# Altium PCB NB2DSK01.PcbDoc (part 3 of 17)
Units mil, origin at the board's own origin, x right, y up, seen from the top; angles counter-clockwise.
Board outline 11815 x 6500.03 mil, 8 copper layers (Top Layer, MidLayer1, MidLayer2, GND, PWR, MidLayer3, MidLayer4, Bottom Layer), stack 74.62 mil thick; 798 components, 1002 nets, 3927 pads, 3182 vias.
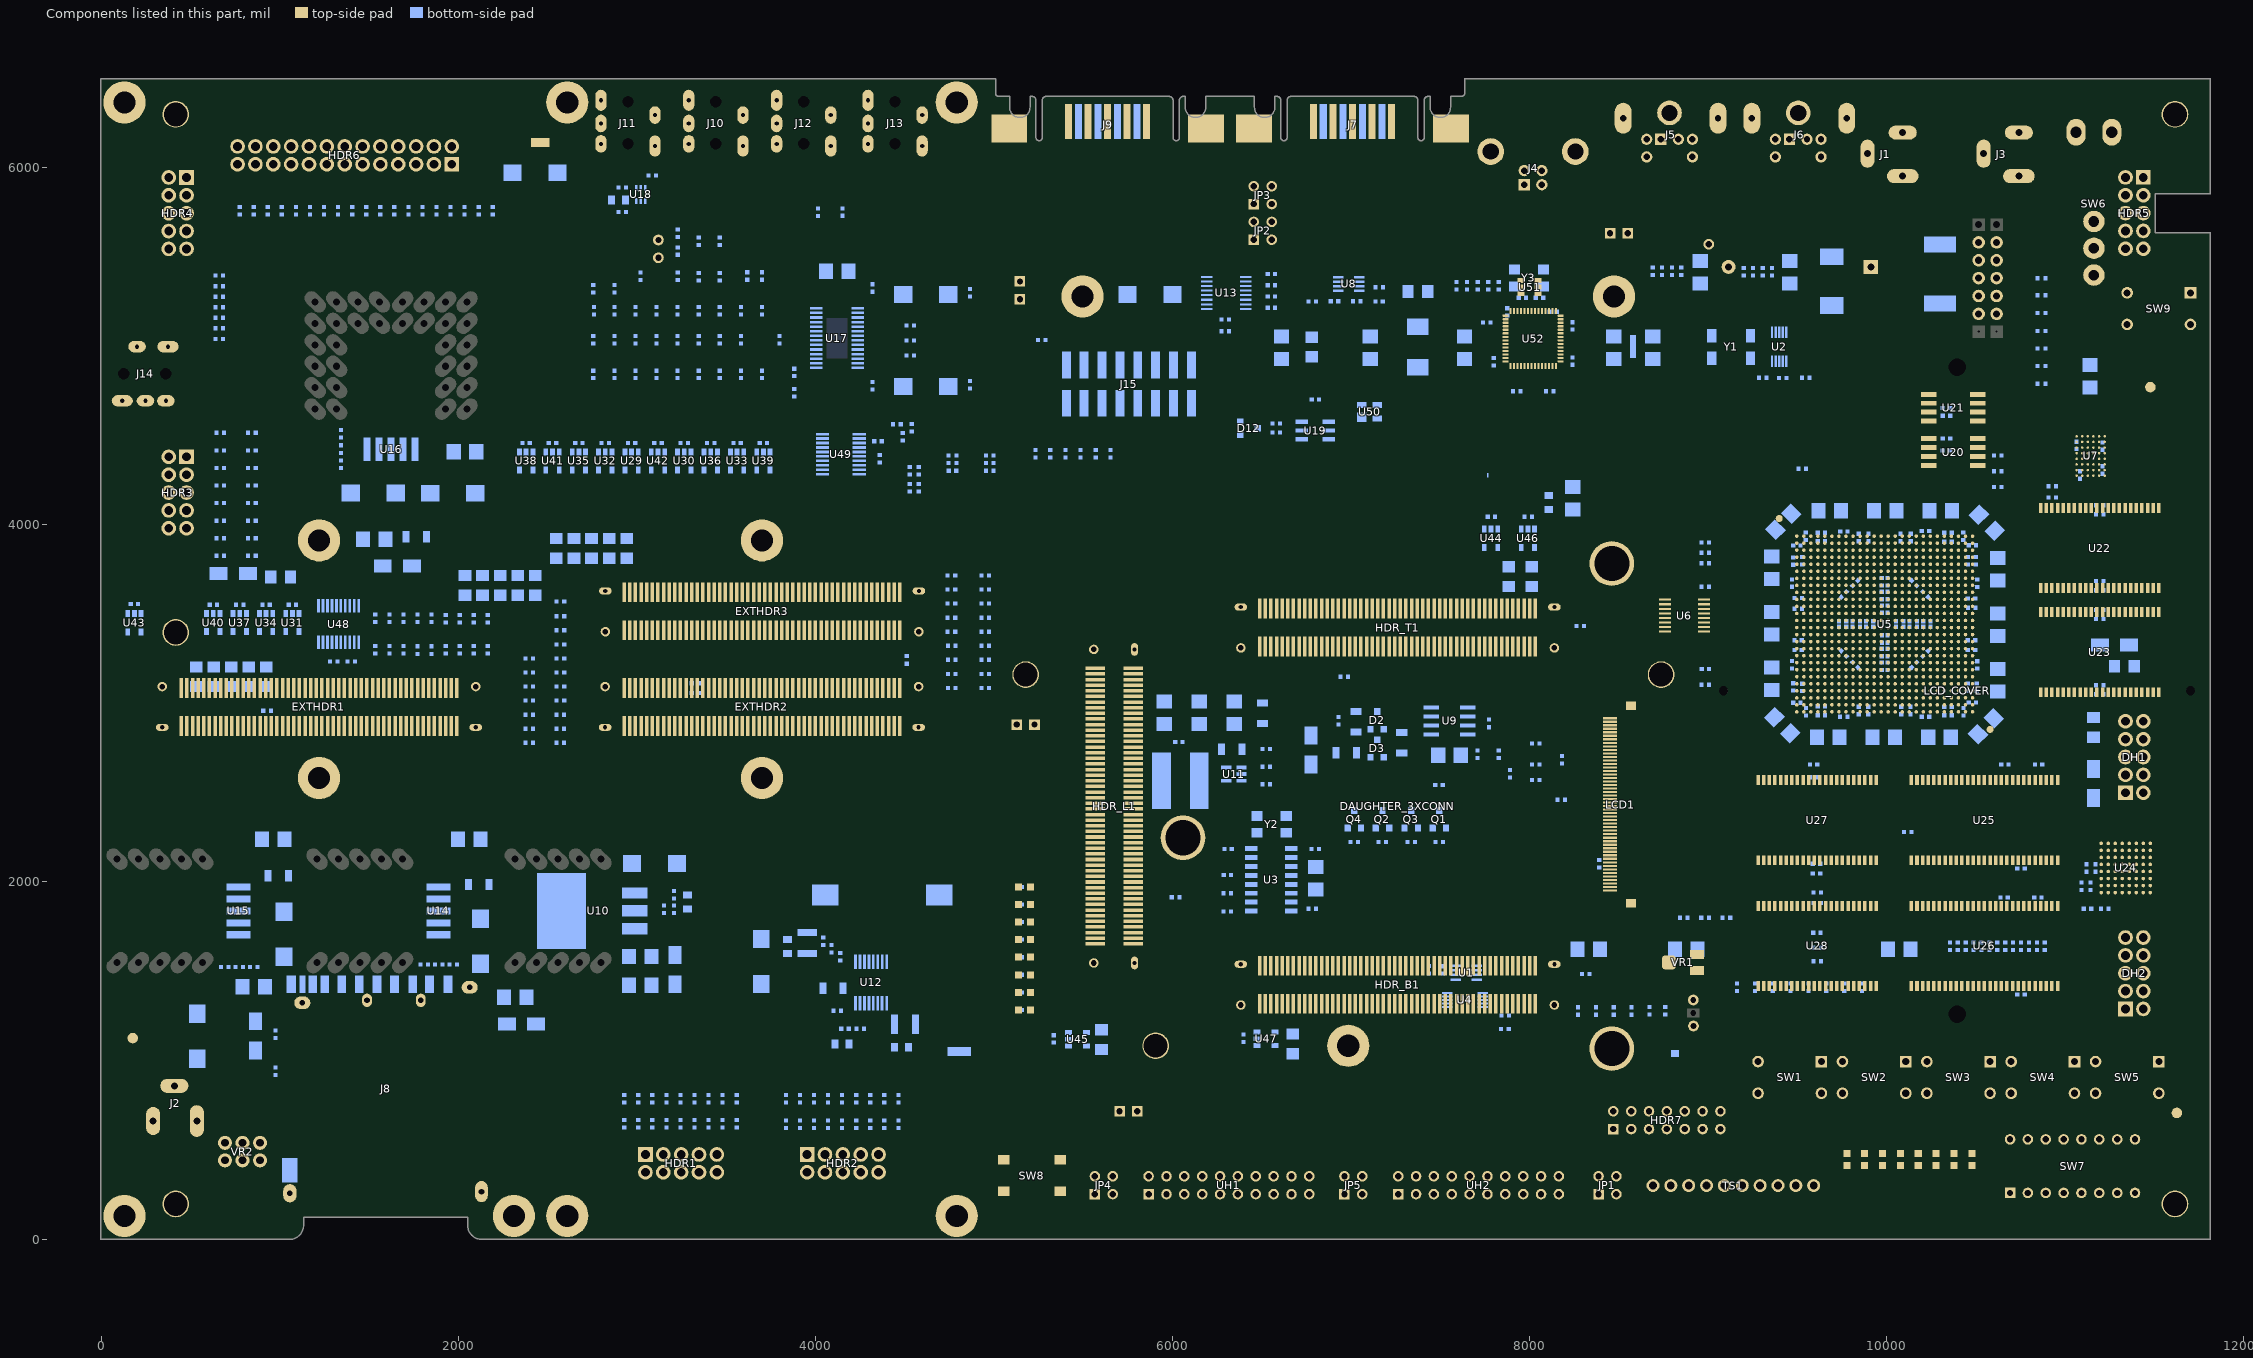
[diagram p9: the components of this part, seen from the top]

## Components (designator, comment, footprint, x,y, rotation, side; value= is the part's Value field where it differs from the comment) (continued)
R303 "1K 1%" RESC1005-STAR 10866.58,5086 r0 bottom locked (schematic designator R12)
R304 "4K7 1%" RESC1005-STAR 10866.58,4987.57 r0 bottom locked (schematic designator R8)
R305 "100R 1%" RESC1005-STAR 10866.58,5381.27 r180 bottom locked (schematic designator R9)
R306 "100R 1%" RESC1005-STAR 10866.58,5286 r180 bottom locked (schematic designator R10)
R307 "100R 1%" RESC1005-STAR 10866.58,4889.15 r0 bottom locked (schematic designator R11)
R308 "100R 1%" RESC1005-STAR 10866.58,4790.72 r0 bottom locked (schematic designator R13)
R309 "1K 1%" RESC1005-STAR 10866.58,5186 r180 bottom locked (schematic designator R14)
R311 "2K7 1%" RESC1005-STAR 7649.66,5338.57 r90 bottom (schematic designator R1_US)
R312 "5K6 1%" RESC1005-STAR 7590.54,5338.57 r270 bottom (schematic designator R2_US)
R313 "10K 1%" RESC1005-STAR 7827.02,5338.57 r270 bottom (schematic designator R8_US)
R314 "4K7 1%" RESC1005-STAR 8112.2,4748.03 r0 bottom locked (schematic designator R4_US)
R315 "27R 1%" RESC1005-STAR 9527.54,4314.95 r180 bottom locked (schematic designator R3_US)
R316 "4K7 1%" RESC1005-STAR 7927.17,4748.03 r180 bottom locked (schematic designator R7_US)
R317 "10M 1%" RESC3216 7373.87,5307.09 r180 bottom (schematic designator R9_US)
R318 "4K7 1%" RESC1005-STAR 7767.9,5338.57 r270 bottom (schematic designator R5_US)
R319 "4K7 1%" RESC1005-STAR 7708.78,5338.57 r270 bottom (schematic designator R6_US)
R320 "120R 1%" RESC1005-STAR 5231.88,4398.03 r270 bottom (schematic designator R3)
SW1 "DPNO TACTILE" IT-2175#1 9456.69,905.51 r180 top locked
SW2 "DPNO TACTILE" IT-2175#1 9929.13,905.51 r180 top locked
SW3 "DPNO TACTILE" IT-2175#1 10401.57,905.51 r180 top locked
SW4 "DPNO TACTILE" IT-2175#1 10874.02,905.51 r180 top locked
SW5 "DPNO TACTILE" IT-2175#1 11346.46,905.51 r180 top locked
SW6 "SPDT SUB" T8019L-TNQ 11160.24,6492.13 r180 top locked (schematic designator SW8)
SW7 "DIP-16 8-way Switch" DIP-16-KEY 10690.32,258.43 r0 top locked (schematic designator SW1)
SW8 "SPNO" SW_DTSM-61NT/R 5212.6,356.3 r0 top locked (schematic designator SW1)
SW9 "DPNO TACTILE" IT-2175#2 11523.62,5211.09 r180 top (schematic designator SW1)
TP1 "5V0" TestPin#1 10614.94,5381.97 r0 top (schematic designator TP2)
TP2 "32K768HZ" TestPin#2 9003.27,5571.82 r180 top locked (schematic designator TP1)
TP3 "REF CLK" TestPin#3 8917.31,1193.48 r180 top (schematic designator TP1)
TP4 "FPGA CLK" TestPin#3 8916.9,1339.03 r180 top (schematic designator TP2)
TP5 "-7V5" TestPin#1 10514.94,5581.97 r180 top (schematic designator TP1)
TP6 "9V0" TestPin#1 10514.94,5381.97 r180 top (schematic designator TP1)
TP7 "VCCX" TestPin#1 10614.94,5581.97 r0 top (schematic designator TP1)
TP8 "16V5" TestPin#1 10514.94,5481.97 r180 top (schematic designator TP1)
TP9 "1V2" TestPin#1 10614.94,5481.97 r0 top (schematic designator TP1)
TP10 "1V8" TestPin#1 10614.94,5281.97 r0 top (schematic designator TP1)
TP11 "2V5" TestPin#1 10514.94,5281.97 r180 top (schematic designator TP1)
TP12 "3V3" TestPin#1 10514.94,5181.97 r180 top (schematic designator TP1)
TP13 "MIXER LEFT" TestPin#2 3120.73,5495.67 r180 top locked (schematic designator TP1)
TP14 "MIXER RIGHT" TestPin#2 3120.73,5595.67 r180 top locked (schematic designator TP2)
TP15 "VBATT" TestPin#1 10614.94,5181.97 r0 top
TS1 "TERMINAL 10 HEADER" TS2.54X10 8690.67,300 r90 top locked
U1 "MAX1037EKA-T" SOT65P280-8 7645.59,1492.06 r180 bottom
U2 "DS1391U-33" SSOP50P490-10 9397.66,4997.47 r0 bottom locked (schematic designator U5)
U3 "ICS307-02" SOIC127P600-16 6553.15,2012.01 r270 bottom locked (schematic designator U1)
U4 "MAX5841MEUB" TSSOP50P490-10 7637.8,1339.38 r0 bottom (schematic designator U1)
U5 "XC3S1500-4FG676C" BGA100P26X26-676 9988.19,3444.88 r0 top locked (schematic designator U1)
U6 "AD7843ARU" TSOP65P638-16 8867.13,3491.5 r270 top locked (schematic designator U15)
U7 "XCF08PFS48C" BGA80P8X6-48 11141.73,4385.83 r270 top locked (schematic designator U1)
U8 "MAX3051EKA-T" SOT65P280-8 6986.05,5349.48 r180 bottom locked (schematic designator U1)
U9 "VRG-100mA-1.2V-37V-4%-75102" SOP127P600-8 7551.18,2901.77 r270 bottom locked (schematic designator U1)
U10 "LM1084IS-ADJ" TO254P1435-4 2988.68,1938.45 r270 bottom (schematic designator U1)
U11 "LM2704MF-ADJCT-ND" SOT95P284-5 6343.5,2604.33 r270 bottom locked (schematic designator U1)
U12 "MAX1831EEE" SOP63P602-16 4311.68,1437.45 r90 bottom (schematic designator U1)
U13 "MAX3232EUE" TSOP65P638-16 6301.84,5299.21 r270 bottom locked (schematic designator U9)
U14 "TPS75501KTTT" TO-263 1888.68,1838.45 r270 bottom (schematic designator U1)
U15 "TPS75501KTTT" TO-263 768.68,1838.45 r270 bottom (schematic designator U1)
U16 "TPS75501KTTT" TO-263 1623.68,4423.45 r180 bottom (schematic designator U1)
U17 "LM4849MH" TSOP65P640_HS-28 4003.94,4879.92 r90 bottom (schematic designator U1)
U18 "MAX9812L" SC70_6L 3047.24,5814.96 r180 bottom (schematic designator U1MIC)
U19 "DS2406" TSOC6 6799.27,4528.53 r270 bottom (schematic designator U1_NB)
U20 "M25P80-VMW6 8Mbit Serial Flash" SOIC8-200-BODY 10234.25,4483.07 r270 top locked (schematic designator U1)
U21 "M25P80-VMW6 8Mbit Serial Flash" SOIC8-200-BODY 10234.25,4731.1 r270 top locked (schematic designator U2)
U22 "SRAM-256Kx16" TSOP80P1176-44 11192.91,3870.08 r0 top locked (schematic designator U1)
U23 "SRAM-256Kx16" TSOP80P1176-44 11192.91,3287.4 r0 top locked (schematic designator U2)
U24 "S29GL256N11FFIV10" BGA100P8X8-64 11338.58,2078.56 r270 top locked (schematic designator U1)
U25 "SDRAM-16Mx16" TSOP80P1176-54 10547.25,2346.46 r180 top locked (schematic designator U1)
U26 "SDRAM-16Mx16" TSOP80P1176-54 10547.25,1641.73 r180 top locked (schematic designator U2)
U27 "SRAM-256Kx16" TSOP80P1176-44 9610.24,2346.46 r180 top locked (schematic designator U1)
U28 "SRAM-256Kx16" TSOP80P1176-44 9610.24,1641.73 r180 top locked (schematic designator U2)
U29 "MAX4372" SOT-23-5 2933.07,4409.45 r0 bottom (schematic designator U8)
U30 "MAX4372" SOT-23-5 3228.35,4409.45 r0 bottom (schematic designator U15)
U31 "MAX4372" SOT-23-5 1033.46,3503.94 r0 bottom (schematic designator U1)
U32 "MAX4372" SOT-23-5 2785.43,4409.45 r0 bottom (schematic designator U9)
U33 "MAX4372" SOT-23-5 3523.62,4409.45 r0 bottom (schematic designator U16)
U34 "MAX4372" SOT-23-5 885.83,3503.94 r0 bottom (schematic designator U2)
U35 "MAX4372" SOT-23-5 2637.8,4409.45 r0 bottom (schematic designator U10)
U36 "MAX4372" SOT-23-5 3375.98,4409.45 r0 bottom (schematic designator U17)
U37 "MAX4372" SOT-23-5 738.19,3503.94 r0 bottom (schematic designator U3)
U38 "MAX4372" SOT-23-5 2342.52,4409.45 r0 bottom (schematic designator U11)
U39 "MAX4372" SOT-23-5 3671.26,4409.45 r0 bottom (schematic designator U18)
U40 "MAX4372" SOT-23-5 590.55,3503.94 r0 bottom (schematic designator U4)
U41 "MAX4372" SOT-23-5 2490.16,4409.45 r0 bottom (schematic designator U12)
U42 "MAX4372" SOT-23-5 3080.71,4409.45 r0 bottom (schematic designator U19)
U43 "MAX4372" SOT-23-5 148.61,3502.9 r0 bottom (schematic designator U5)
U44 "MAX4372" SOT-23-5 7746.06,3976.38 r0 bottom (schematic designator U6)
U45 "MAX4372" SOT-23-5 5417.41,1082.08 r90 bottom (schematic designator U20)
U46 "MAX4372" SOT-23-5 7952.76,3976.38 r0 bottom (schematic designator U7)
U47 "MAX4372" SOT-23-5 6473,1085.1 r90 bottom (schematic designator U21)
U48 "MAX1229" QSOP65P600-20 1217.5,3547.24 r0 bottom (schematic designator U13)
U49 "MAX1229" QSOP65P600-20 4039.37,4283.46 r90 bottom (schematic designator U14)
U50 "MAX6315US26D1" SOT143 7103.55,4633.53 r90 bottom locked (schematic designator U16_US)
U51 "NUP2201MR6T1G" TSOP95P275-6 8000,5331.69 r90 top (schematic designator U13_US)
U52 "CY7C68001-56LFC" QFN50P800X800_HS-57 8019.68,5043.45 r180 top (schematic designator U7_US)
UH1 "2x10 HEADER" HDR2X10 5866.14,251.97 r0 top locked
UH2 "2x10 HEADER" HDR2X10 7263.78,251.97 r0 top locked
VR1 "20K linear" TRIM_3314J-1-203E 8858.27,1549.47 r180 top
VR2 "2x5K linear" POT-R0911G-A1 791.34,539.37 r180 bottom locked (schematic designator VR1)
Y1 "32.768 kHz 12.5pF" "XTAL QSC26 QSMC-200S COMBI" 9276.27,4996.46 r90 bottom
Y2 "20MHZ" XTAL-200X126-4 6555.12,2322.84 r180 bottom locked (schematic designator Y1)
Y3 "24MHZ" XTAL-200X126-4 7996.06,5382.69 r180 bottom (schematic designator Y1_US)

## Footprints (in the part's own frame and the unit in brackets; to place one, negate y for a bottom-side part, rotate by r counter-clockwise, add the part's x,y. Pads: shape width x height; smd on the part's side, far side on the other; paste and mask are expansions set on the pad)
0603LED [mm]
  rect 1x1 smd paste+0 mask+0: 1(0.85,0) 2(-0.85,0)
  silkscreen extent -1.97,-0.85 1.6,0.85, body extent -0.92,-0.53 1.09,0.53, height 0.46
53751 [mm]
  rect 0.5x2.8 smd: 1(-19.6,-2.7) 2(-19.6,2.7) 3(-18.8,-2.7) 4(-18.8,2.7) 5(-18,-2.7) 6(-18,2.7) 7(-17.2,-2.7) 8(-17.2,2.7) 9(-16.4,-2.7) 10(-16.4,2.7) 11(-15.6,-2.7) 12(-15.6,2.7) 13(-14.8,-2.7) 14(-14.8,2.7) 15(-14,-2.7) 16(-14,2.7) 17(-13.2,-2.7) 18(-13.2,2.7) 19(-12.4,-2.7) 20(-12.4,2.7) 21(-11.6,-2.7) 22(-11.6,2.7) 23(-10.8,-2.7) 24(-10.8,2.7) 25(-10,-2.7) 26(-10,2.7) 27(-9.2,-2.7) 28(-9.2,2.7) 29(-8.4,-2.7) 30(-8.4,2.7) 31(-7.6,-2.7) 32(-7.6,2.7) 33(-6.8,-2.7) 34(-6.8,2.7) 35(-6,-2.7) 36(-6,2.7) 37(-5.2,-2.7) 38(-5.2,2.7) 39(-4.4,-2.7) 40(-4.4,2.7) 41(-3.6,-2.7) 42(-3.6,2.7) 43(-2.8,-2.7) 44(-2.8,2.7) 45(-2,-2.7) 46(-2,2.7) 47(-1.2,-2.7) 48(-1.2,2.7) 49(-0.4,-2.7) 50(-0.4,2.7) 51(0.4,-2.7) 52(0.4,2.7) 53(1.2,-2.7) 54(1.2,2.7) 55(2,-2.7) 56(2,2.7) 57(2.8,-2.7) 58(2.8,2.7) 59(3.6,-2.7) 60(3.6,2.7) 61(4.4,-2.7) 62(4.4,2.7) 63(5.2,-2.7) 64(5.2,2.7) 65(6,-2.7) 66(6,2.7) 67(6.8,-2.7) 68(6.8,2.7) 69(7.6,-2.7) 70(7.6,2.7) 71(8.4,-2.7) 72(8.4,2.7) 73(9.2,-2.7) 74(9.2,2.7) 75(10,-2.7) 76(10,2.7) 77(10.8,-2.7) 78(10.8,2.7) 79(11.6,-2.7) 80(11.6,2.7) 81(12.4,-2.7) 82(12.4,2.7) 83(13.2,-2.7) 84(13.2,2.7) 85(14,-2.7) 86(14,2.7) 87(14.8,-2.7) 88(14.8,2.7) 89(15.6,-2.7) 90(15.6,2.7) 91(16.4,-2.7) 92(16.4,2.7) 93(17.2,-2.7) 94(17.2,2.7) 95(18,-2.7) 96(18,2.7) 97(18.8,-2.7) 98(18.8,2.7) 99(19.6,-2.7) 100(19.6,2.7)
  round 1.35 hole 0.8: MH1(-22.283,-2.9) MH3(22.317,-2.9)
  oval 1.8x1 hole 0.6 slot 1.4 at 0 deg: MH2(-22.283,2.9) MH4(22.317,2.9)
  silkscreen extent -30,-4.77 30.05,4.5, body extent -30.33,-4.4 30.37,4.4, height 11.7
070221XE009GX14BU#1 [mm]
  rect 1x5 smd mask+0: 1(5.55,0) 2(2.775,0) 3(0,0) 4(-2.775,0) 5(-5.55,0)
  rect 1x5 smd far side mask+0: 6(4.163,0) 7(1.388,0) 8(-1.388,0) 9(-4.163,0)
  rect 5.08x4 smd mask+0: 10(14,-1) 11(-14,-1)
  silkscreen extent -16.5,-4.9 16.5,8.01, body extent -15.41,-0.4 15.41,14.1, height 6.25
070221XE009GX14BU#2 [mm]
  rect 1x5 smd mask+0: 1(5.55,0) 2(2.775,0) 3(0,0) 4(-2.775,0) 5(-5.55,0)
  rect 1x5 smd far side: 6(4.163,0) 7(1.388,0) 8(-1.388,0) 9(-4.163,0)
  rect 5.08x4 smd mask+0.051: 10(14,-1) 11(-14,-1)
  silkscreen extent -16.5,-4.9 16.5,8.01, body extent -15.41,-0.4 15.41,14.1, height 6.25
440119 [mm] "Connector; USB1.1, Type B, Thru-Hole; 4 Position; Right Angle"
  rect 1.6x1.6 hole 0.9: 1(-1,1.25)
  round 1.6 hole 0.9: 2(-1,-1.25) 3(1,-1.25) 4(1,1.25)
  round 3.8 hole 2.3: 5(3.71,6.02) 6(3.71,-6.02)
  silkscreen extent -2.41,-8.25 13.99,8.24, body extent -1.44,-6.75 13.28,8.15, height 8.15
918510X323#1 [mil] "Connector; IDC, Low Profile Male Header, Thru-Hole; 10 Position; Right Angle; Pitch 2.54 mm; Body 20.32 x 8.9 x 9.2 mm (LxWxH)"
  rect 82x82 hole 49.21: 1(-200,-100)
  round 82 hole 49.21: 2(-200,0) 3(-100,-100) 4(-100,0) 5(0,-100) 6(0,0) 7(100,-100) 8(100,0) 9(200,-100) 10(200,0)
  silkscreen extent -400,0 400,372, body extent -406,-123 406,374, height 315
918510X323#2 [mil] "Connector; IDC, Low Profile Male Header, Thru-Hole; 10 Position; Right Angle; Pitch 2.54 mm; Body 20.32 x 8.9 x 9.2 mm (LxWxH)"
  rect 82x82 hole 49.21: 1(200,100)
  round 82 hole 49.21: 2(200,0) 3(100,100) 4(100,0) 5(0,100) 6(0,0) 7(-100,100) 8(-100,0) 9(-200,100) 10(-200,0)
  silkscreen extent -400,-372 400,0
918510X323#3 [mil] "Connector; IDC, Low Profile Male Header, Thru-Hole; 10 Position; Right Angle; Pitch 2.54 mm; Body 20.32 x 8.9 x 9.2 mm (LxWxH)"
  rect 82x82 hole 49.21: 1(200,0)
  round 82 hole 49.21: 2(200,-100) 3(100,0) 4(100,-100) 5(0,0) 6(0,-100) 7(-100,0) 8(-100,-100) 9(-200,0) 10(-200,-100)
  silkscreen extent -400,0 400,372, body extent -406,-123 406,374, height 315
BGA80P8X6-48 [mm] "48-Ball Chip Scale Ball Grid Array 0.8mm Pitch (FS48)"
  round 0.35 smd: A1(-2.8,-2) A2(-2.8,-1.2) A3(-2.8,-0.4) A4(-2.8,0.4) A5(-2.8,1.2) A6(-2.8,2) B1(-2,-2) B2(-2,-1.2) B3(-2,-0.4) B4(-2,0.4) B5(-2,1.2) B6(-2,2) C1(-1.2,-2) C2(-1.2,-1.2) C3(-1.2,-0.4) C4(-1.2,0.4) C5(-1.2,1.2) C6(-1.2,2) D1(-0.4,-2) D2(-0.4,-1.2) D3(-0.4,-0.4) D4(-0.4,0.4) D5(-0.4,1.2) D6(-0.4,2) E1(0.4,-2) E2(0.4,-1.2) E3(0.4,-0.4) E4(0.4,0.4) E5(0.4,1.2) E6(0.4,2) F1(1.2,-2) F2(1.2,-1.2) F3(1.2,-0.4) F4(1.2,0.4) F5(1.2,1.2) F6(1.2,2) G1(2,-2) G2(2,-1.2) G3(2,-0.4) G4(2,0.4) G5(2,1.2) G6(2,2) H1(2.8,-2) H2(2.8,-1.2) H3(2.8,-0.4) H4(2.8,0.4) H5(2.8,1.2) H6(2.8,2)
  silkscreen extent -4.5,-4.78 4.5,4, body extent -4.51,-3.92 4.42,3.97, height 1
BGA100P8X8-64 [mm] "AMD 64-Ball Fortfied Ball grid Array (FBGA)"
  round 0.5 smd: A1(-3.5,-3.5) A2(-3.5,-2.5) A3(-3.5,-1.5) A4(-3.5,-0.5) A5(-3.5,0.5) A6(-3.5,1.5) A7(-3.5,2.5) A8(-3.5,3.5) B1(-2.5,-3.5) B2(-2.5,-2.5) B3(-2.5,-1.5) B4(-2.5,-0.5) B5(-2.5,0.5) B6(-2.5,1.5) B7(-2.5,2.5) B8(-2.5,3.5) C1(-1.5,-3.5) C2(-1.5,-2.5) C3(-1.5,-1.5) C4(-1.5,-0.5) C5(-1.5,0.5) C6(-1.5,1.5) C7(-1.5,2.5) C8(-1.5,3.5) D1(-0.5,-3.5) D2(-0.5,-2.5) D3(-0.5,-1.5) D4(-0.5,-0.5) D5(-0.5,0.5) D6(-0.5,1.5) D7(-0.5,2.5) D8(-0.5,3.5) E1(0.5,-3.5) E2(0.5,-2.5) E3(0.5,-1.5) E4(0.5,-0.5) E5(0.5,0.5) E6(0.5,1.5) E7(0.5,2.5) E8(0.5,3.5) F1(1.5,-3.5) F2(1.5,-2.5) F3(1.5,-1.5) F4(1.5,-0.5) F5(1.5,0.5) F6(1.5,1.5) F7(1.5,2.5) F8(1.5,3.5) G1(2.5,-3.5) G2(2.5,-2.5) G3(2.5,-1.5) G4(2.5,-0.5) G5(2.5,0.5) G6(2.5,1.5) G7(2.5,2.5) G8(2.5,3.5) H1(3.5,-3.5) H2(3.5,-2.5) H3(3.5,-1.5) H4(3.5,-0.5) H5(3.5,0.5) H6(3.5,1.5) H7(3.5,2.5) H8(3.5,3.5)
  silkscreen extent -6.5,-6.32 6.5,5.5, body extent -6.35,-5.4 6.41,5.36, height 1
BGA100P26X26-676 [mm]
  round 0.5 smd: A1(-12.5,12.5) A2(-11.5,12.5) A3(-10.5,12.5) A4(-9.5,12.5) A5(-8.5,12.5) A6(-7.5,12.5) A7(-6.5,12.5) A8(-5.5,12.5) A9(-4.5,12.5) A10(-3.5,12.5) A11(-2.5,12.5) A12(-1.5,12.5) A13(-0.5,12.5) A14(0.5,12.5) A15(1.5,12.5) A16(2.5,12.5) A17(3.5,12.5) A18(4.5,12.5) A19(5.5,12.5) A20(6.5,12.5) A21(7.5,12.5) A22(8.5,12.5) A23(9.5,12.5) A24(10.5,12.5) A25(11.5,12.5) A26(12.5,12.5) AA1(-12.5,-7.5) AA2(-11.5,-7.5) AA3(-10.5,-7.5) AA4(-9.5,-7.5) AA5(-8.5,-7.5) AA6(-7.5,-7.5) AA7(-6.5,-7.5) AA8(-5.5,-7.5) AA9(-4.5,-7.5) AA10(-3.5,-7.5) AA11(-2.5,-7.5) AA12(-1.5,-7.5) AA13(-0.5,-7.5) AA14(0.5,-7.5) AA15(1.5,-7.5) AA16(2.5,-7.5) AA17(3.5,-7.5) AA18(4.5,-7.5) AA19(5.5,-7.5) AA20(6.5,-7.5) AA21(7.5,-7.5) AA22(8.5,-7.5) AA23(9.5,-7.5) AA24(10.5,-7.5) AA25(11.5,-7.5) AA26(12.5,-7.5) AB1(-12.5,-8.5) AB2(-11.5,-8.5) AB3(-10.5,-8.5) AB4(-9.5,-8.5) AB5(-8.5,-8.5) AB6(-7.5,-8.5) AB7(-6.5,-8.5) AB8(-5.5,-8.5) AB9(-4.5,-8.5) AB10(-3.5,-8.5) AB11(-2.5,-8.5) AB12(-1.5,-8.5) AB13(-0.5,-8.5) AB14(0.5,-8.5) AB15(1.5,-8.5) AB16(2.5,-8.5) AB17(3.5,-8.5) AB18(4.5,-8.5) AB19(5.5,-8.5) AB20(6.5,-8.5) AB21(7.5,-8.5) AB22(8.5,-8.5) AB23(9.5,-8.5) AB24(10.5,-8.5) AB25(11.5,-8.5) AB26(12.5,-8.5) AC1(-12.5,-9.5) AC2(-11.5,-9.5) AC3(-10.5,-9.5) AC4(-9.5,-9.5) AC5(-8.5,-9.5) AC6(-7.5,-9.5) AC7(-6.5,-9.5) AC8(-5.5,-9.5) AC9(-4.5,-9.5) AC10(-3.5,-9.5) AC11(-2.5,-9.5) AC12(-1.5,-9.5) AC13(-0.5,-9.5) AC14(0.5,-9.5) AC15(1.5,-9.5) AC16(2.5,-9.5) AC17(3.5,-9.5) AC18(4.5,-9.5) AC19(5.5,-9.5) AC20(6.5,-9.5) AC21(7.5,-9.5) AC22(8.5,-9.5) AC23(9.5,-9.5) AC24(10.5,-9.5) AC25(11.5,-9.5) AC26(12.5,-9.5) AD1(-12.5,-10.5) AD2(-11.5,-10.5) AD3(-10.5,-10.5) AD4(-9.5,-10.5) AD5(-8.5,-10.5) AD6(-7.5,-10.5) AD7(-6.5,-10.5) AD8(-5.5,-10.5) AD9(-4.5,-10.5) AD10(-3.5,-10.5) AD11(-2.5,-10.5) AD12(-1.5,-10.5) AD13(-0.5,-10.5) AD14(0.5,-10.5) AD15(1.5,-10.5) AD16(2.5,-10.5) AD17(3.5,-10.5) AD18(4.5,-10.5) AD19(5.5,-10.5) AD20(6.5,-10.5) AD21(7.5,-10.5) AD22(8.5,-10.5) AD23(9.5,-10.5) AD24(10.5,-10.5) AD25(11.5,-10.5) AD26(12.5,-10.5) AE1(-12.5,-11.5) AE2(-11.5,-11.5) AE3(-10.5,-11.5) AE4(-9.5,-11.5) AE5(-8.5,-11.5) AE6(-7.5,-11.5) AE7(-6.5,-11.5) AE8(-5.5,-11.5) AE9(-4.5,-11.5) AE10(-3.5,-11.5) AE11(-2.5,-11.5) AE12(-1.5,-11.5) AE13(-0.5,-11.5) AE14(0.5,-11.5) AE15(1.5,-11.5) AE16(2.5,-11.5) AE17(3.5,-11.5) AE18(4.5,-11.5) AE19(5.5,-11.5) AE20(6.5,-11.5) AE21(7.5,-11.5) AE22(8.5,-11.5) AE23(9.5,-11.5) AE24(10.5,-11.5) AE25(11.5,-11.5) AE26(12.5,-11.5) AF1(-12.5,-12.5) AF2(-11.5,-12.5) AF3(-10.5,-12.5) AF4(-9.5,-12.5) AF5(-8.5,-12.5) AF6(-7.5,-12.5) AF7(-6.5,-12.5) AF8(-5.5,-12.5) AF9(-4.5,-12.5) AF10(-3.5,-12.5) AF11(-2.5,-12.5) AF12(-1.5,-12.5) AF13(-0.5,-12.5) AF14(0.5,-12.5) AF15(1.5,-12.5) AF16(2.5,-12.5) AF17(3.5,-12.5) AF18(4.5,-12.5) AF19(5.5,-12.5) AF20(6.5,-12.5) AF21(7.5,-12.5) AF22(8.5,-12.5) AF23(9.5,-12.5) AF24(10.5,-12.5) AF25(11.5,-12.5) AF26(12.5,-12.5) B1(-12.5,11.5) B2(-11.5,11.5) B3(-10.5,11.5) B4(-9.5,11.5) B5(-8.5,11.5) B6(-7.5,11.5) B7(-6.5,11.5) B8(-5.5,11.5) B9(-4.5,11.5) B10(-3.5,11.5) B11(-2.5,11.5) B12(-1.5,11.5) B13(-0.5,11.5) B14(0.5,11.5) B15(1.5,11.5) B16(2.5,11.5) B17(3.5,11.5) B18(4.5,11.5) B19(5.5,11.5) B20(6.5,11.5) B21(7.5,11.5) B22(8.5,11.5) B23(9.5,11.5) B24(10.5,11.5) B25(11.5,11.5) B26(12.5,11.5) C1(-12.5,10.5) C2(-11.5,10.5) C3(-10.5,10.5) C4(-9.5,10.5) C5(-8.5,10.5) C6(-7.5,10.5) C7(-6.5,10.5) C8(-5.5,10.5) C9(-4.5,10.5) C10(-3.5,10.5) C11(-2.5,10.5) C12(-1.5,10.5) C13(-0.5,10.5) C14(0.5,10.5) C15(1.5,10.5) C16(2.5,10.5) C17(3.5,10.5) C18(4.5,10.5) C19(5.5,10.5) C20(6.5,10.5) C21(7.5,10.5) C22(8.5,10.5) C23(9.5,10.5) C24(10.5,10.5) C25(11.5,10.5) C26(12.5,10.5) D1(-12.5,9.5) D2(-11.5,9.5) D3(-10.5,9.5) D4(-9.5,9.5) D5(-8.5,9.5) D6(-7.5,9.5) D7(-6.5,9.5) D8(-5.5,9.5) D9(-4.5,9.5) D10(-3.5,9.5) D11(-2.5,9.5) D12(-1.5,9.5) D13(-0.5,9.5) D14(0.5,9.5) D15(1.5,9.5) D16(2.5,9.5) D17(3.5,9.5) D18(4.5,9.5) D19(5.5,9.5) D20(6.5,9.5) D21(7.5,9.5) D22(8.5,9.5) D23(9.5,9.5) D24(10.5,9.5) D25(11.5,9.5) D26(12.5,9.5) E1(-12.5,8.5) E2(-11.5,8.5) E3(-10.5,8.5) E4(-9.5,8.5) E5(-8.5,8.5) E6(-7.5,8.5) E7(-6.5,8.5) E8(-5.5,8.5) E9(-4.5,8.5) E10(-3.5,8.5) E11(-2.5,8.5) E12(-1.5,8.5) E13(-0.5,8.5) E14(0.5,8.5) E15(1.5,8.5) E16(2.5,8.5) E17(3.5,8.5) E18(4.5,8.5) E19(5.5,8.5) E20(6.5,8.5) E21(7.5,8.5) E22(8.5,8.5) E23(9.5,8.5) E24(10.5,8.5) E25(11.5,8.5) E26(12.5,8.5) F1(-12.5,7.5) F2(-11.5,7.5) F3(-10.5,7.5) F4(-9.5,7.5) F5(-8.5,7.5) F6(-7.5,7.5) F7(-6.5,7.5) F8(-5.5,7.5) F9(-4.5,7.5) F10(-3.5,7.5) F11(-2.5,7.5) F12(-1.5,7.5) F13(-0.5,7.5) F14(0.5,7.5) F15(1.5,7.5) F16(2.5,7.5) F17(3.5,7.5) F18(4.5,7.5) F19(5.5,7.5) F20(6.5,7.5) F21(7.5,7.5) F22(8.5,7.5) F23(9.5,7.5) F24(10.5,7.5) F25(11.5,7.5) F26(12.5,7.5) G1(-12.5,6.5) G2(-11.5,6.5) G3(-10.5,6.5) G4(-9.5,6.5) G5(-8.5,6.5) G6(-7.5,6.5) G7(-6.5,6.5) G8(-5.5,6.5) G9(-4.5,6.5) G10(-3.5,6.5) G11(-2.5,6.5) G12(-1.5,6.5) G13(-0.5,6.5) G14(0.5,6.5) G15(1.5,6.5) G16(2.5,6.5) G17(3.5,6.5) G18(4.5,6.5) G19(5.5,6.5) G20(6.5,6.5) G21(7.5,6.5) G22(8.5,6.5) G23(9.5,6.5) G24(10.5,6.5) G25(11.5,6.5) G26(12.5,6.5) H1(-12.5,5.5) H2(-11.5,5.5) H3(-10.5,5.5) H4(-9.5,5.5) H5(-8.5,5.5) H6(-7.5,5.5) H7(-6.5,5.5) H8(-5.5,5.5) H9(-4.5,5.5) H10(-3.5,5.5) H11(-2.5,5.5) H12(-1.5,5.5) H13(-0.5,5.5) H14(0.5,5.5) H15(1.5,5.5) H16(2.5,5.5) H17(3.5,5.5) H18(4.5,5.5) H19(5.5,5.5) H20(6.5,5.5) H21(7.5,5.5) H22(8.5,5.5) H23(9.5,5.5) H24(10.5,5.5) H25(11.5,5.5) H26(12.5,5.5) J1(-12.5,4.5) J2(-11.5,4.5) J3(-10.5,4.5) J4(-9.5,4.5) J5(-8.5,4.5) J6(-7.5,4.5) J7(-6.5,4.5) J8(-5.5,4.5) J9(-4.5,4.5) J10(-3.5,4.5) J11(-2.5,4.5) J12(-1.5,4.5) J13(-0.5,4.5) J14(0.5,4.5) J15(1.5,4.5) J16(2.5,4.5) J17(3.5,4.5) J18(4.5,4.5) J19(5.5,4.5) J20(6.5,4.5) J21(7.5,4.5) J22(8.5,4.5) J23(9.5,4.5) J24(10.5,4.5) J25(11.5,4.5) J26(12.5,4.5) K1(-12.5,3.5) K2(-11.5,3.5) K3(-10.5,3.5) K4(-9.5,3.5) K5(-8.5,3.5) K6(-7.5,3.5) K7(-6.5,3.5) K8(-5.5,3.5) K9(-4.5,3.5) K10(-3.5,3.5) K11(-2.5,3.5) K12(-1.5,3.5) K13(-0.5,3.5) K14(0.5,3.5) K15(1.5,3.5) K16(2.5,3.5) K17(3.5,3.5) K18(4.5,3.5) K19(5.5,3.5) K20(6.5,3.5) K21(7.5,3.5) K22(8.5,3.5) K23(9.5,3.5) K24(10.5,3.5) K25(11.5,3.5) K26(12.5,3.5) L1(-12.5,2.5) L2(-11.5,2.5) L3(-10.5,2.5) L4(-9.5,2.5) L5(-8.5,2.5) L6(-7.5,2.5) L7(-6.5,2.5) L8(-5.5,2.5) L9(-4.5,2.5) L10(-3.5,2.5) L11(-2.5,2.5) L12(-1.5,2.5) L13(-0.5,2.5) L14(0.5,2.5) L15(1.5,2.5) L16(2.5,2.5) L17(3.5,2.5) L18(4.5,2.5) L19(5.5,2.5) L20(6.5,2.5) L21(7.5,2.5) L22(8.5,2.5) L23(9.5,2.5) L24(10.5,2.5) L25(11.5,2.5) L26(12.5,2.5) M1(-12.5,1.5) M2(-11.5,1.5) M3(-10.5,1.5) M4(-9.5,1.5) M5(-8.5,1.5) M6(-7.5,1.5) M7(-6.5,1.5) M8(-5.5,1.5) M9(-4.5,1.5) M10(-3.5,1.5) M11(-2.5,1.5) M12(-1.5,1.5) M13(-0.5,1.5) M14(0.5,1.5) M15(1.5,1.5) M16(2.5,1.5) M17(3.5,1.5) M18(4.5,1.5) M19(5.5,1.5) M20(6.5,1.5) M21(7.5,1.5) M22(8.5,1.5) M23(9.5,1.5) M24(10.5,1.5) M25(11.5,1.5) M26(12.5,1.5) N1(-12.5,0.5) N2(-11.5,0.5) N3(-10.5,0.5) N4(-9.5,0.5) N5(-8.5,0.5) N6(-7.5,0.5) N7(-6.5,0.5) N8(-5.5,0.5) N9(-4.5,0.5) N10(-3.5,0.5) N11(-2.5,0.5) N12(-1.5,0.5) N13(-0.5,0.5) N14(0.5,0.5) N15(1.5,0.5) N16(2.5,0.5) N17(3.5,0.5) N18(4.5,0.5) N19(5.5,0.5) N20(6.5,0.5) N21(7.5,0.5) N22(8.5,0.5) N23(9.5,0.5) N24(10.5,0.5) N25(11.5,0.5) N26(12.5,0.5) P1(-12.5,-0.5) P2(-11.5,-0.5) P3(-10.5,-0.5) P4(-9.5,-0.5) P5(-8.5,-0.5) P6(-7.5,-0.5) P7(-6.5,-0.5) P8(-5.5,-0.5) P9(-4.5,-0.5) P10(-3.5,-0.5) P11(-2.5,-0.5) P12(-1.5,-0.5) P13(-0.5,-0.5) P14(0.5,-0.5) P15(1.5,-0.5) P16(2.5,-0.5) P17(3.5,-0.5) P18(4.5,-0.5) P19(5.5,-0.5) P20(6.5,-0.5) P21(7.5,-0.5) P22(8.5,-0.5) P23(9.5,-0.5) P24(10.5,-0.5) P25(11.5,-0.5) P26(12.5,-0.5) R1(-12.5,-1.5) R2(-11.5,-1.5) R3(-10.5,-1.5) R4(-9.5,-1.5) R5(-8.5,-1.5) R6(-7.5,-1.5) R7(-6.5,-1.5) R8(-5.5,-1.5) R9(-4.5,-1.5) R10(-3.5,-1.5) R11(-2.5,-1.5) R12(-1.5,-1.5) R13(-0.5,-1.5) R14(0.5,-1.5) R15(1.5,-1.5) R16(2.5,-1.5) R17(3.5,-1.5) R18(4.5,-1.5) R19(5.5,-1.5) R20(6.5,-1.5) R21(7.5,-1.5) R22(8.5,-1.5) R23(9.5,-1.5) R24(10.5,-1.5) R25(11.5,-1.5) R26(12.5,-1.5) T1(-12.5,-2.5) T2(-11.5,-2.5) T3(-10.5,-2.5) T4(-9.5,-2.5) T5(-8.5,-2.5) T6(-7.5,-2.5) T7(-6.5,-2.5) T8(-5.5,-2.5) T9(-4.5,-2.5) T10(-3.5,-2.5) T11(-2.5,-2.5) T12(-1.5,-2.5) T13(-0.5,-2.5) T14(0.5,-2.5) T15(1.5,-2.5) T16(2.5,-2.5) T17(3.5,-2.5) T18(4.5,-2.5) T19(5.5,-2.5) T20(6.5,-2.5) T21(7.5,-2.5) T22(8.5,-2.5) T23(9.5,-2.5) T24(10.5,-2.5) T25(11.5,-2.5) T26(12.5,-2.5) U1(-12.5,-3.5) U2(-11.5,-3.5) U3(-10.5,-3.5) U4(-9.5,-3.5) U5(-8.5,-3.5) U6(-7.5,-3.5) U7(-6.5,-3.5) U8(-5.5,-3.5) U9(-4.5,-3.5) U10(-3.5,-3.5) U11(-2.5,-3.5) U12(-1.5,-3.5) U13(-0.5,-3.5) U14(0.5,-3.5) U15(1.5,-3.5) U16(2.5,-3.5) U17(3.5,-3.5) U18(4.5,-3.5) U19(5.5,-3.5) U20(6.5,-3.5) U21(7.5,-3.5) U22(8.5,-3.5) U23(9.5,-3.5) U24(10.5,-3.5) U25(11.5,-3.5) U26(12.5,-3.5) V1(-12.5,-4.5) V2(-11.5,-4.5) V3(-10.5,-4.5) V4(-9.5,-4.5) V5(-8.5,-4.5) V6(-7.5,-4.5) V7(-6.5,-4.5) V8(-5.5,-4.5) V9(-4.5,-4.5) V10(-3.5,-4.5) V11(-2.5,-4.5) V12(-1.5,-4.5) V13(-0.5,-4.5) V14(0.5,-4.5) V15(1.5,-4.5) V16(2.5,-4.5) V17(3.5,-4.5) V18(4.5,-4.5) V19(5.5,-4.5) V20(6.5,-4.5) V21(7.5,-4.5) V22(8.5,-4.5) V23(9.5,-4.5) V24(10.5,-4.5) V25(11.5,-4.5) V26(12.5,-4.5) W1(-12.5,-5.5) W2(-11.5,-5.5) W3(-10.5,-5.5) W4(-9.5,-5.5) W5(-8.5,-5.5) W6(-7.5,-5.5) W7(-6.5,-5.5) W8(-5.5,-5.5) W9(-4.5,-5.5) W10(-3.5,-5.5) W11(-2.5,-5.5) W12(-1.5,-5.5) W13(-0.5,-5.5) W14(0.5,-5.5) W15(1.5,-5.5) W16(2.5,-5.5) W17(3.5,-5.5) W18(4.5,-5.5) W19(5.5,-5.5) W20(6.5,-5.5) W21(7.5,-5.5) W22(8.5,-5.5) W23(9.5,-5.5) W24(10.5,-5.5) W25(11.5,-5.5) W26(12.5,-5.5) Y1(-12.5,-6.5) Y2(-11.5,-6.5) Y3(-10.5,-6.5) Y4(-9.5,-6.5) Y5(-8.5,-6.5) Y6(-7.5,-6.5) Y7(-6.5,-6.5) Y8(-5.5,-6.5) Y9(-4.5,-6.5) Y10(-3.5,-6.5) Y11(-2.5,-6.5) Y12(-1.5,-6.5) Y13(-0.5,-6.5) Y14(0.5,-6.5) Y15(1.5,-6.5) Y16(2.5,-6.5) Y17(3.5,-6.5) Y18(4.5,-6.5) Y19(5.5,-6.5) Y20(6.5,-6.5) Y21(7.5,-6.5) Y22(8.5,-6.5) Y23(9.5,-6.5) Y24(10.5,-6.5) Y25(11.5,-6.5) Y26(12.5,-6.5)
  round 1 on Mech7 paste-0.55 mask+1: FID1(-15,15) FID1(15,-15)
  round 1 smd paste-0.55 mask+0.635: FID1(-15,15) FID1(15,-15)
  Top Layer keep-out circle w0.2: c-15,15 r1
  Top Layer keep-out circle w0.2: c15,-15 r1
  silkscreen extent -14.77,-13.5 13.5,13.5, body extent -13.55,-13.45 13.45,13.55, height 2.6
CAPC1005-STAR [mm] "Chip Capacitor 1005"
  rect 0.6x0.6 smd: 1(-0.525,0) 2(0.525,0)
  silkscreen extent -0.05,-0.38 0.05,0.38, body extent -0.57,-0.3 0.57,0.3, height 0.2
CAPC2012-STAR [mm] "0805 Capacitor SMD - Startronics"
  rect 1x1.25 smd: 1(-1,0) 2(1,0)
  silkscreen extent -0.4,-1 0.4,1, body extent -1.32,-0.69 1.23,0.67, height 0.5
CAPC3216-STAR [mm] "Capacitor 1206 (3216) for Startronics"
  rect 1x1.6 smd: 1(-1.45,0) 2(1.45,0)
  silkscreen extent -0.62,-1.1 0.62,1.1, body extent -1.64,-0.89 1.63,0.86, height 0.9
CAPC3225-STAR [mm] "1210 Capacitor SMD - Startronics"
  rect 1x2.75 smd: 1(-1.5,0) 2(1.5,0)
  silkscreen extent -0.7,-1.5 0.7,1.5, body extent -1.94,-1.2 1.89,1.29, height 1.5
CAPC3528-STAR [mm] "Capacitor 3.5x2.8mm (B-Case)"
  rect 2x2.2 smd: 1(-1.6,0) 2(1.6,0)
  silkscreen extent -3,-1.7 3.05,1.7, body extent -1.79,-1.54 1.8,1.54, height 1
CAPC7343-STAR [mm] "Capcacitor SMD 7.3 x 4.3mm (D-Case)"
  rect 2.6x2.4 smd: 1(-3.202,0.007) 2(3.198,0.007)
  silkscreen extent -5.33,-2.39 5.08,2.41, body extent -3.5,-2.03 3.51,2.04, height 1.75
CAPM7163 [mm]
  rect 2.35x3.1 smd: 1(-2.875,0) 2(2.875,0)
  silkscreen extent -3.5,-3.15 3.5,3.15, body extent -3.1,-2.64 3.2,2.81, height 1.5
CELL_HOLDER [mm] "Lithium Battery Holder for CR2032 3V Cell"
  round 2 hole 1: 1(12.275,0)
  rect 2x2 hole 1: 2(-7.95,0)
  Top Layer keep-out region: -6.475,-3.6 -3.95,-3.6 -3.95,3.6 -6.475,3.6
  Top Layer keep-out region: -3.95,1.525 -3.95,3.6 -8.1,3.6 -8.1,1.525
  Top Layer keep-out region: -8.1,-1.525 -8.1,-3.6 -3.95,-3.6 -3.95,-1.525
  Top Layer keep-out region: 12.3,1.525 12.3,3.6 9.575,3.6 9.575,1.525
  Top Layer keep-out region: 9.575,-1.525 9.575,-3.6 12.3,-3.6 12.3,-1.525
  Top Layer keep-out region: 10.8,3.6 9.575,3.6 9.575,-3.6 10.8,-3.6
  silkscreen extent -10.6,-10.6 13.47,10.6, body extent -10.62,-10.59 13.17,10.63, height 10
DAUGHTER_BOARD_2XCONN [mil] "Outline of 2-Connector Daughter Board"
DAUGHTER_BOARD_3XCONN [mm] "Outline of 3-Connector Daughter Board"
  round 6.35 hole 5 paste+0 mask+0: LPA(37.492,68.6) LPB(-23.508,29.6) LPC(37.492,-0.4)
  Top Layer region: -41.203,105.291 -41.203,110.106 -43.134,110.106 -43.134,105.291
  Top Layer region: -31.022,112.031 -41.203,112.031 -41.203,110.1 -31.022,110.1
  Top Layer region: 43.134,105.291 43.134,110.106 41.203,110.106 41.203,105.291
  Top Layer region: 31.022,110.1 41.203,110.1 41.203,112.031 31.022,112.031
  Top Layer region: -43.131,1.506 -43.131,-3.309 -41.2,-3.309 -41.2,1.506
  Top Layer region: -31.019,-3.315 -41.2,-3.315 -41.2,-5.246 -31.019,-5.246
  Top Layer lines w0.5: -41.45,109.85 cw(c-40.95,109.85) -40.95,110.35 ; -41.447,-3.066 ccw(c-40.947,-3.066) -40.947,-3.566 ; 40.95,110.35 cw(c40.95,109.85) 41.45,109.85
  Top Layer lines w1.9: -42.182,110.033 cw(c-41.133,110.033) -41.133,111.082 ; -42.18,-3.248 ccw(c-41.13,-3.248) -41.13,-4.298 ; 41.133,111.082 cw(c41.133,110.033) 42.182,110.033
  silkscreen extent -43.13,-5.24 43.13,112.03
DIOM5027 [mm]
  rect 2.55x1.85 smd: 1(-2.075,0) 2(2.075,0)
  silkscreen extent -3.75,-1.33 4.05,1.33, body extent -2.36,-0.91 2.46,0.92, height 1.3
DIOM8059 [mm] "DO-214-AB/SMC; 2 C-Bend Leads; Body 7.9 x 5.9 mm, inc. leads (LxW)"
  rect 2.4x3.3 smd: 1(-3.475,0) 2(3.475,0)
  silkscreen extent -5.07,-2.05 5.43,2.05, body extent -3.29,-1.56 3.92,1.57, height 1.3
DIP-16-KEY [mm] "DIP; 16 Leads; Row Spacing 7.62 mm; Pitch 2.54 mm"
  rect 1.5x1.5 hole 0.9: 1(0,0)
  round 1.5 hole 0.9: 2(2.54,0) 3(5.08,0) 4(7.62,0) 5(10.16,0) 6(12.7,0) 7(15.24,0) 8(17.78,0) 9(17.78,7.62) 10(15.24,7.62) 11(12.7,7.62) 12(10.16,7.62) 13(7.62,7.62) 14(5.08,7.62) 15(2.54,7.62) 16(0,7.62)
  silkscreen extent -2.05,-1.59 19.83,9.2, body extent -2.01,-1.76 19.88,9.49, height 6
"FIDUCIAL ROUND" [mm] "FIDUCIAL ROUND"
  round 1.5 all layers, no hole paste+0 mask+1.1: 0(0,0)
  Top Layer circle w0.127: c0,0 r1.778
  Bottom Layer circle w0.127: c0,0 r1.778
  Keep-Out Layer circle w0.1: c0,0 r1.9
HDR1X2 [mm]
  rect 1.5x1.5 hole 0.9: 1(-0.01,0.007) 2(2.53,0.007)
  silkscreen extent -1.28,-1.26 3.8,1.28, body extent -1.03,-0.98 3.47,1.02, height 7
HDR2X2 [mm]
  rect 1.5x1.5 hole 0.9: 1(0,0)
  round 1.5 hole 0.9: 2(0,2.54) 3(2.54,0) 4(2.54,2.54)
  silkscreen extent -1.27,-1.27 3.81,3.81, body extent -1.19,-1.15 3.67,3.73, height 9
HDR2X7 [mm]
  rect 1.5x1.5 hole 0.9: 1(0,0)
  round 1.5 hole 0.9: 2(0,2.54) 3(2.54,0) 4(2.54,2.54) 5(5.08,0) 6(5.08,2.54) 7(7.62,0) 8(7.62,2.54) 9(10.16,0) 10(10.16,2.54) 11(12.7,0) 12(12.7,2.54) 13(15.24,0) 14(15.24,2.54)
  silkscreen extent -1.27,-1.27 16.51,3.81, body extent -0.95,-1.21 16.55,3.78, height 9
HDR2X8_SMT [mil]
  rect 50x150 smd: 1(0,0) 2(0,215) 3(100,0) 4(100,215) 5(200,0) 6(200,215) 7(300,0) 8(300,215) 9(400,0) 10(400,215) 11(500,0) 12(500,215) 13(600,0) 14(600,215) 15(700,0) 16(700,215)
  silkscreen extent -51,-85 750,300, body extent -46,-47 746,253, height 246
HDR2X10 [mm]
  rect 1.5x1.5 hole 0.9: 1(0,0)
  round 1.5 hole 0.9: 2(0,2.54) 3(2.54,0) 4(2.54,2.54) 5(5.08,0) 6(5.08,2.54) 7(7.62,0) 8(7.62,2.54) 9(10.16,0) 10(10.16,2.54) 11(12.7,0) 12(12.7,2.54) 13(15.24,0) 14(15.24,2.54) 15(17.78,0) 16(17.78,2.54) 17(20.32,0) 18(20.32,2.54) 19(22.86,0) 20(22.86,2.54)
  silkscreen extent -1.27,-1.27 24.13,3.81, body extent -1.19,-1.16 23.99,3.74, height 9
HDR2X13_RA_CENTRONICS [mil] "Connector; IDC, Low Profile Male Header, Thru-Hole; 26 Position; Right Angle; Pitch 2.54 mm; Body 40.64 x 8.9 x 9.2 mm (LxWxH)"
  rect 82x82 hole 49.21: 1(-600,-100)
  round 82 hole 49.21: 2(-500,-100) 3(-400,-100) 4(-300,-100) 5(-200,-100) 6(-100,-100) 7(0,-100) 8(100,-100) 9(200,-100) 10(300,-100) 11(400,-100) 12(500,-100) 13(600,-100) 14(-600,0) 15(-500,0) 16(-400,0) 17(-300,0) 18(-200,0) 19(-100,0) 20(0,0) 21(100,0) 22(200,0) 23(300,0) 24(400,0) 25(500,0) 26(600,0)
  silkscreen extent -800,0 800,372, body extent -799,-120 810,376, height 315
HITACHI_TX09D50VM1CAA [mm]
  rect 2x0.3 smd: 1(-16.2,-28.4) 2(-16.2,-27.9) 3(-16.2,-27.4) 4(-16.2,-26.9) 5(-16.2,-26.4) 6(-16.2,-25.9) 7(-16.2,-25.4) 8(-16.2,-24.9) 9(-16.2,-24.4) 10(-16.2,-23.9) 11(-16.2,-23.4) 12(-16.2,-22.9) 13(-16.2,-22.4) 14(-16.2,-21.9) 15(-16.2,-21.4) 16(-16.2,-20.9) 17(-16.2,-20.4) 18(-16.2,-19.9) 19(-16.2,-19.4) 20(-16.2,-18.9) 21(-16.2,-18.4) 22(-16.2,-17.9) 23(-16.2,-17.4) 24(-16.2,-16.9) 25(-16.2,-16.4) 26(-16.2,-15.9) 27(-16.2,-15.4) 28(-16.2,-14.9) 29(-16.2,-14.4) 30(-16.2,-13.9) 31(-16.2,-13.4) 32(-16.2,-12.9) 33(-16.2,-12.4) 34(-16.2,-11.9) 35(-16.2,-11.4) 36(-16.2,-10.9) 37(-16.2,-10.4) 38(-16.2,-9.9) 39(-16.2,-9.4) 40(-16.2,-8.9) 41(-16.2,-8.4) 42(-16.2,-7.9) 43(-16.2,-7.4) 44(-16.2,-6.9) 45(-16.2,-6.4) 46(-16.2,-5.9) 47(-16.2,-5.4) 48(-16.2,-4.9) 49(-16.2,-4.4) 50(-16.2,-3.9)
  rect 1.4x1.2 smd: MH1(-13.175,-30.25) MH1(-13.175,-2.15)
  silkscreen extent -15.68,-30.25 1,-2.15, body extent -15.76,-30.33 -9.95,-2.14, height 1.5
INDP7575 [mm]
  rect 2.7x8 smd: 1(-2.7,0) 2(2.7,0)
  silkscreen extent -1.21,-3.74 1.18,3.73, body extent -3.71,-3.67 3.7,3.7, height 4.25
INDP182140 [mm]
  rect 3.8x3 smd: 1(-8.1,0) 2(8.1,0)
  silkscreen extent -8.5,-7.31 8.5,7.3, body extent -7.63,-5.4 7.6,5.47, height 7
IT-2175#1 [mm] "Switch, Push Button, Thru-Hole; 4 Leads; Body 8.5 x 8.5 mm (LxW typ); Row Spacing 9.0 mm; Pitch 4.5 mm"
  rect 1.65x1.65 hole 1: 1(-4.5,-2.25)
  round 1.65 hole 1: 2(4.5,-2.25) 3(-4.5,2.25) 4(4.5,2.25)
  silkscreen extent -4.25,-4.25 4.25,4.25, body extent -4.98,-4.37 4.98,4.33, height 4.5
IT-2175#2 [mm] "Switch, Push Button, Thru-Hole; 4 Leads; Body 8.5 x 8.5 mm (LxW typ); Row Spacing 9.0 mm; Pitch 4.5 mm"
  rect 1.65x1.65 hole 1: 1(-4.5,-2.25)
  round 1.65 hole 1: 2(-4.5,2.25) 3(4.5,-2.25) 4(4.5,2.25)
  silkscreen extent -4.25,-4.25 4.25,4.25, body extent -4.98,-4.37 4.98,4.33, height 4.5
KLD-0202 [mm]
  oval 2x4.5 hole 1 slot 3.5 at 90 deg: 1(13.7,0)
  oval 2x4 hole 1 slot 3 at 90 deg: 2(7.5,0)
  oval 4x2 hole 1 slot 3 at 0 deg: 3(10.5,-5)
  silkscreen extent 0,-4.5 13.7,4.5, body extent -0.26,-5.21 14.24,4.29, height 11
LCD_COVER [mm]
  round 1.1 hole 1.3 unplated: TFT_MOUNT(-33.2,-46) TFT_MOUNT(33.2,-46)
  round 2 hole 2.5 unplated: TFT_MOUNT(0,-92) TFT_MOUNT(0,0)
  Keep-Out Layer circle w0.4: c33.2,-46 r1.105
  Keep-Out Layer circle w0.4: c-33.2,-46 r1.105
  Keep-Out Layer circle w0.4: c0,-92 r2.154
  Keep-Out Layer circle w0.4: c0,0 r2.154
  silkscreen extent -33.8,-93.95 33.8,1.95
LEAD_FREE_S [mil]
  silkscreen extent -125,-125 125,125
Logo-Altium [mil]
  silkscreen extent -1025,-99 -556,102
MF_SM250 [mm] "PTC Resetatable Fuse"
  rect 2.3x4.6 smd: 1(-2.323,0.127) 2(6.077,0.127)
  silkscreen extent -4.12,-2.62 7.88,2.88, body extent -2.41,-2.27 6.2,2.51, height 1.7
MINIDIN6GREEN [mm]
  rect 1.6x1.6 hole 0.9: 1(8.45,-1.25)
  round 1.6 hole 0.9: 2(8.45,1.25) 3(8.45,-3.25) 4(8.45,3.25) 5(10.95,-3.25) 6(10.95,3.25)
  round 3.5 hole 2.3: MH1(4.7,0)
  oval 4.4x2.4 hole 0.9 slot 2.4 at 0 deg: MH2(5.45,6.905) MH3(5.45,-6.595)
  silkscreen extent -0.05,-7 12.7,7, body extent 0,-6.98 12.8,7.02, height 6.5
MINIDIN6PURPLE [mm]
  rect 1.6x1.6 hole 0.9: 1(8.45,-1.25)
  round 1.6 hole 0.9: 2(8.45,1.25) 3(8.45,-3.25) 4(8.45,3.25) 5(10.95,-3.25) 6(10.95,3.25)
  round 3.5 hole 2.3: MH1(4.7,0)
  oval 4.4x2.4 hole 0.9 slot 2.4 at 0 deg: MH2(5.45,6.905) MH3(5.45,-6.595)
  silkscreen extent -0.05,-7 12.7,7, body extent -0.1,-7.03 12.7,6.97, height 6.5
MOUNTING_HOLE_3MM [mm] "Non-plated mounting hole for 3mm screw"
  round 3.8 hole 3.4 mask+0.2: MOUNT(0,0)
  Top Layer circle w1: c0,0 r2.3
  Top Layer region: -2.8,-2.8 2.8,-2.8 2.8,2.8 -2.8,2.8
  Top Layer keep-out region: -3.3,-3.3 3.3,-3.3 3.3,3.3 -3.3,3.3
  Bottom Layer region: -2.8,-2.8 2.8,-2.8 2.8,2.8 -2.8,2.8
  Bottom Layer keep-out region: -3.3,-3.3 3.3,-3.3 3.3,3.3 -3.3,3.3
  Keep-Out Layer circle w1: c0,0 r2
"NANOBOARD LOGO" [mil]
  silkscreen extent -442,-67 456,59
NETTIE-SMT2-8X8#1 [mil]
  rect 10x7.87 on Mid1 paste-4.33 mask-4.33: 1(-35.1,-0.24) 2(-27.22,-0.24)
NETTIE-SMT2-8X8#2 [mil]
  rect 15.75x7.87 smd paste-4.33 mask-4.33: 1(-35.08,-0.24) 2(-27.2,-0.24)
NETTIE-SMT2-16X11 [mm]
  rect 0.8x1.016 smd paste-0.5 mask-0.5: 1(-0.891,-0.7) 2(-0.6,-0.7)
NETTIE-SMT2-31X39 [mm]
  rect 1.6x1.27 smd paste+0 mask+0: 1(-1.691,0.006) 2(-0.691,0.006)
NETTIE-SMT2-31X51#1 [mm]
  rect 2x1.27 smd paste-0.5 mask+0: 1(-0.891,0.006) 2(0.409,0.006)
NETTIE-SMT2-31X51#2 [mm]
  rect 2x0.8 smd paste-0.5 mask-0.5: 1(-0.891,0.006) 2(0.409,0.006)
PERIPHERAL_BOARD_1SLOT#1 [mil] "Outline of 2-Slot Peripheral Board"
  Top Layer region: 2440.94,452.76 2366.14,527.56 2366.14,937.01 2440.94,1011.81
  Top Layer region: 2440.94,2216.54 2366.14,2291.34 2366.14,2940.94 2440.94,3015.75
  Top Layer region: 1712.6,3228.35 1787.4,3153.54 2153.54,3153.54 2228.35,3228.35
  Top Layer region: 0,452.76 74.8,527.56 74.8,937.01 0,1011.81
  Top Layer region: 0,2216.54 74.8,2291.34 74.8,2940.94 0,3015.75
  silkscreen extent 0,0 2441,3228
PERIPHERAL_BOARD_1SLOT#2 [mil] "Outline of 2-Slot Peripheral Board"
  Top Layer region: 728.35,3228.35 653.54,3153.54 287.4,3153.54 212.6,3228.35
  Top Layer region: 0,2216.54 74.8,2291.34 74.8,2940.94 0,3015.75
  Top Layer region: 0,452.76 74.8,527.56 74.8,937.01 0,1011.81
  Top Layer region: 1712.6,3228.35 1787.4,3153.54 2153.54,3153.54 2228.35,3228.35
  Top Layer region: 2440.94,2216.54 2366.14,2291.34 2366.14,2940.94 2440.94,3015.75
  Top Layer region: 2440.94,452.76 2366.14,527.56 2366.14,937.01 2440.94,1011.81
  silkscreen extent 0,0 2441,3228
PERIPHERAL_BOARD_2SLOT [mil] "Outline of 2-Slot Peripheral Board"
  Top Layer region: 4921.26,452.76 4846.46,527.56 4846.46,937.01 4921.26,1011.81
  Top Layer region: 4921.26,2216.54 4846.46,2291.34 4846.46,2940.94 4921.26,3015.75
  Top Layer region: 0,452.76 74.8,527.56 74.8,937.01 0,1011.81
  Top Layer region: 728.35,3228.35 653.54,3153.54 287.4,3153.54 212.6,3228.35
  silkscreen extent 0,0 4921,3228
POT-R0911G-A1 [mm]
  round 2 hole 1.1: 1(-2.5,0) 2(0,0) 3(2.5,0) 4(-2.5,-2.5) 5(0,-2.5) 6(2.5,-2.5)
  silkscreen extent -4.9,-22.3 4.5,2.3, body extent -5.74,-26.56 5.75,2.91, height 12.64
QFN50P800X800_HS-57 [mm] "Quad Flat No Lead; 56 Terminals; Body 8 x 8 mm; Pitch 0.5 mm, Punch Version"
  rrect50% 0.3x0.86 smd: 1(-3.25,-3.92) 2(-2.75,-3.92) 3(-2.25,-3.92) 4(-1.75,-3.92) 5(-1.25,-3.92) 6(-0.75,-3.92) 7(-0.25,-3.92) 8(0.25,-3.92) 9(0.75,-3.92) 10(1.25,-3.92) 11(1.75,-3.92) 12(2.25,-3.92) 13(2.75,-3.92) 14(3.25,-3.92) 29(3.25,3.92) 30(2.75,3.92) 31(2.25,3.92) 32(1.75,3.92) 33(1.25,3.92) 34(0.75,3.92) 35(0.25,3.92) 36(-0.25,3.92) 37(-0.75,3.92) 38(-1.25,3.92) 39(-1.75,3.92) 40(-2.25,3.92) 41(-2.75,3.92) 42(-3.25,3.92)
  rrect50% 0.86x0.3 smd: 15(3.92,-3.25) 16(3.92,-2.75) 17(3.92,-2.25) 18(3.92,-1.75) 19(3.92,-1.25) 20(3.92,-0.75) 21(3.92,-0.25) 22(3.92,0.25) 23(3.92,0.75) 24(3.92,1.25) 25(3.92,1.75) 26(3.92,2.25) 27(3.92,2.75) 28(3.92,3.25) 43(-3.92,3.25) 44(-3.92,2.75) 45(-3.92,2.25) 46(-3.92,1.75) 47(-3.92,1.25) 48(-3.92,0.75) 49(-3.92,0.25) 50(-3.92,-0.25) 51(-3.92,-0.75) 52(-3.92,-1.25) 53(-3.92,-1.75) 54(-3.92,-2.25) 55(-3.92,-2.75) 56(-3.92,-3.25)
  Top Layer region: -2.75,-2.75 2.75,-2.75 2.75,2.75 -2.75,2.75
  silkscreen extent -4.05,-4.83 4.05,4.05, body extent -4.32,-4.24 4.26,4.28, height 0.55
QSOP65P600-20 [mil]
  rect 15x75 smd: 1(0,0) 2(25,0) 3(50,0) 4(75,0) 5(100,0) 6(125,0) 7(150,0) 8(175,0) 9(200,0) 10(225,0) 11(225,205) 12(200,205) 13(175,205) 14(150,205) 15(125,205) 16(100,205) 17(75,205) 18(50,205) 19(25,205) 20(0,205)
  silkscreen extent -38,6 240,146, body extent -15,-5 240,210, height 29
RESC1005-STAR [mm] "Chip Inductor 1005"
  rect 0.575x0.6 smd: 1(-0.538,0) 2(0.538,0)
  silkscreen extent -0.05,-0.38 0.05,0.38, body extent -0.71,-0.25 0.72,0.26, height 0.25
RESC3216 [mm]
  rect 1.6x1.8 smd: 1(-1.4,0) 2(1.4,0)
  silkscreen extent -0.3,-0.8 0.3,0.8, body extent -1.33,-0.81 1.37,0.85, height 0.55
SC70_6L [mm]
  rect 0.4x0.85 smd: 1(0,0) 2(0.65,0) 3(1.3,0) 4(1.3,1.85) 5(0.65,1.85) 6(0,1.85)
  silkscreen extent -0.8,-0.55 1.8,1.85, body extent -0.43,-0.38 1.73,2.22, height 0.64
SD_CARD_HRS_609_0003_5 [mm] "Hirose Secure Digital Card SMT Reverse"
  rect 1.25x2.5 smd: 1(-6.875,1.25) 2(-4.47,1.25) 3(-1.875,1.25) 4(0.625,1.25) 5(3.125,1.25) 6(5.625,1.25) 7(8.05,1.25) 8(9.75,1.25) 9(-9.47,1.25)
  rect 0.8x2.5 smd: CD(11.2,1.25)
  rect 1.4x2.5 smd: COM(12.8,1.25)
  oval 1.8x3 hole 0.8 slot 2 at 90 deg: S1(-14.25,-28.25)
  oval 1.9x2.6 hole 0.8 slot 1.5 at 90 deg: S2(13,-28.48)
  oval 2.3x1.8 hole 0.8 slot 1.3 at 0 deg: S3(-12.57,0.8) S6(11.23,-1.4)
  oval 1.4x1.9 hole 0.8 slot 1.3 at 90 deg: S4(-5.62,-1.05) S5(2.03,-1.05)
  rect 2.2x3.5 smd: WP(13,-25.23)
  Top Layer region: 9.975,-21.125 14.114,-21.125 14.114,-27 9.975,-27
  silkscreen extent -14.25,-26.8 13.5,-0.1, body extent -14.36,-28.3 13.84,2.1, height 2.9
SOIC8-200-BODY [mm] "SOIC (JEDEC) 8 PIN, 200 mils body width"
  rect 0.7x2.2 smd: 1(0,0) 2(1.27,0) 3(2.54,0) 4(3.81,0) 5(3.81,7) 6(2.54,7) 7(1.27,7) 8(0,7)
  silkscreen extent -1.34,0.54 4.4,5.4, body extent -0.61,0.06 4.47,7.1, height 1
SOIC127P600-16 [mm]
  rect 0.7x1.8 smd: 1(-4.445,-2.85) 2(-3.175,-2.85) 3(-1.905,-2.85) 4(-0.635,-2.85) 5(0.635,-2.85) 6(1.905,-2.85) 7(3.175,-2.85) 8(4.445,-2.85) 9(4.445,2.85) 10(3.175,2.85) 11(1.905,2.85) 12(0.635,2.85) 13(-0.635,2.85) 14(-1.905,2.85) 15(-3.175,2.85) 16(-4.445,2.85)
  silkscreen extent -5.42,-2.72 5,1.1, body extent -5,-2.93 4.95,2.93, height 1
SOP63P602-16 [mil]
  rect 82x16 smd: 1(-116,87.5) 2(-116,62) 3(-116,37.5) 4(-116,12.5) 5(-116,-12.5) 6(-116,-37.5) 7(-116,-62.5) 8(-116,-87.5) 9(116,-87.5) 10(116,-62.5) 11(116,-37.5) 12(116,-12.5) 13(116,12.5) 14(116,37.5) 15(116,62.5) 16(116,87.5)
  silkscreen extent -100,-100 60,125, body extent -107,-100 108,103, height 29
SOP127P600-8 [mm]
  rect 0.6x2.2 smd: 1(-1.905,-2.6) 2(-0.635,-2.6) 3(0.635,-2.6) 4(1.905,-2.6) 5(1.905,2.6) 6(0.635,2.6) 7(-0.635,2.6) 8(-1.905,2.6)
  silkscreen extent -2.88,-2.72 2.5,1.1, body extent -2.45,-2.76 2.39,2.98, height 1
SOT65P280-8 [mm]
  rect 1.5x0.35 smd: 1(-1.5,0.975) 2(-1.5,0.325) 3(-1.5,-0.325) 4(-1.5,-0.975) 5(1.5,-0.975) 6(1.5,-0.325) 7(1.5,0.325) 8(1.5,0.975)
  silkscreen extent -0.55,-1.3 0.55,1.3, body extent -1.58,-1.26 1.6,1.28, height 0.8
SOT95P230-3C [mm] "SOT23, 1=bottom-left, 2=bottom-right, 3=top"
  rect 0.9x0.95 smd: 1(-0.95,-1.25) 2(0.95,-1.25) 3(0,1.25)
  silkscreen extent -1.3,-0.38 1.3,1.25, body extent -1.14,-1.18 1.17,1.44, height 0.38
SOT95P230-3D [mm] "SOT23, 1=bottom-left, 2=top, 3=bottom-right"
  rect 0.9x0.95 smd: 1(-0.95,-1.25) 2(0,1.25) 3(0.95,-1.25)
  silkscreen extent -1.3,-0.38 1.3,1.25, body extent -1.14,-1.25 1.17,1.36, height 0.38
SOT95P284-5 [mm]
  rect 0.55x1.45 smd: 1(-0.95,-1.075) 2(0,-1.075) 3(0.95,-1.075) 4(0.95,1.075) 5(-0.95,1.075)
  silkscreen extent -1.67,-2.23 1.55,0.9, body extent -1.53,-1.46 1.5,1.54, height 0.8
SOT143 [mm] "SOT-143; 4 Leads; Body 3 x 2.6 mm, inc. leads (LxW max)"
  rect 1.35x1.35 smd: 1(-0.75,-1.1)
  rect 0.9x1.35 smd: 2(0.95,-1.1) 3(0.95,1.1) 4(-0.95,1.1)
  silkscreen extent -1.87,-2.22 1.75,0.7, body extent -1.52,-1.5 1.51,1.46, height 0.8
SOT-23-5 [mil] "SOT-23-5, 5-lead Small Outline Package (0.953mm pitch)"
  rect 27x39 smd: 1(0,0) 2(37.5,0) 3(75,0) 4(75,102) 5(0,102)
  silkscreen extent -30,30 105,85, body extent -22,-5 97,113, height 31
SSOP50P490-10 [mm] "Shrink Small Outline; 10 Leads; Body Width 3 mm; Pitch 0.5 mm"
  rect 0.3x1.6 smd: 1(-1,-2.05) 2(-0.5,-2.05) 3(0,-2.05) 4(0.5,-2.05) 5(1,-2.05) 6(1,2.05) 7(0.5,2.05) 8(0,2.05) 9(-0.5,2.05) 10(-1,2.05)
  silkscreen extent -1.82,-2.17 1.58,0.85, body extent -1.61,-1.97 1.62,1.93, height 0.8
STANDOFF_SOLDER_3MM [mm] "Non-plated hole for 3mm Soldered Standoff"
  round 6 / inner round 5 / far side round 5 hole 3.15 mask+0.1: STAND(0,0)
  Top Layer circle w1: c0,0 r2.2
  Top Layer keep-out circle w0.254: c0,0 r3.3
  Bottom Layer keep-out lines w0.4: -3.3,3.3 3.3,3.3 3.3,-3.3 -3.3,-3.3 -3.3,3.3
  Keep-Out Layer circle w0.6: c0,0 r2.2
  body extent -1.51,-1.51 1.51,1.51, height 9
SW_DTSM-61NT/R [mm] "Switch, Push Button, Thru-Hole; 4 Leads; Body 8.5 x 8.5 mm (LxW typ); Row Spacing 9.0 mm; Pitch 4.5 mm"
  rect 1.6x1.4 smd: 1(4.01,-2.25) 2(-4,-2.25) 3(4.01,2.24) 4(-4,2.24)
  silkscreen extent -3.16,-3.16 3.15,3.15, body extent -4.5,-3.1 4.5,3.1, height 4.5
T8019L-TNQ [mm]
  round 3.048 hole 1.5: 1(0,20.142) 2(0,23.952) 3(0,27.762)
  oval 2.7x3.81 hole 1.6: S1(2.54,7.442) S2(-2.54,7.442)
  silkscreen extent -3.43,0 3.43,26.11, body extent -3.5,-8.38 3.5,28.01, height 13
TestPin#1 [mil]
  round 70 hole 39.37: 1(0,0)
  silkscreen extent -41,-39 156,39
TestPin#2 [mil]
  round 60 hole 35.43: 1(0,0)
  silkscreen extent -41,-39 156,39
TestPin#3 [mil]
  round 60 hole 31.5: 1(-0.02,0.01)
  silkscreen extent -41,-39 156,39
TO254P1435-4 [mm]
  rect 1.6x3.6 smd: 1(0,0) 2(2.54,0) 3(5.08,0)
  rect 10.8x6.99 smd mask-1.25: 4(2.54,10.45)
  silkscreen extent -3.1,-0.13 8.2,15.4, body extent -3.01,-0.19 7.93,14.97, height 4
TO-263 [mm]
  rect 1x3.4 smd: 1(-3.4,0) 2(-1.7,0) 3(0,0) 4(1.7,0) 5(3.4,0)
  silkscreen extent -6,-2 6,16, body extent -5.14,-0.56 5.44,15.69, height 4
TRIM_3314J-1-203E [mm]
  rect 2x1.3 smd: 1(-2,-1.15) 3(-2,1.15)
  rrect50% 2x2 smd: 2(2,0)
  silkscreen extent -2.5,-2.5 2.5,2.5, body extent -2.43,-2.33 2.6,2.33, height 2
TS2.54X10 [mm] "10 way 2.54mm Pitch screw terminal"
  round 1.85 hole 1.1: 1(0,0) 2(0,-2.54) 3(0,-5.08) 4(0,-7.62) 5(0,-10.16) 6(0,-12.7) 7(0,-15.24) 8(0,-17.78) 9(0,-20.32) 10(0,-22.86)
  silkscreen extent -3.2,-24.38 3.25,1.52, body extent -3.1,-24.36 3.1,1.5, height 8.5
TSH-3675 [mm]
  oval 3x1.6 hole 0.6 slot 2 at 0 deg: 1(-0.2,3.85) 2(6.3,-3.85)
  oval 2.5x1.6 hole 0.6 slot 1.5 at 0 deg: 3(6,3.85) 10(1.9,-3.85) 11(3.1,3.85)
  round 1.3 hole 1.6 unplated: 12(6,0) 13(0,0)
  silkscreen extent -6,-4.75 9,4.75, body extent -6.15,-4.67 8.85,4.83, height 5
TSOC6 [mil]
  rect 25x71 smd: 1(-50,-75) 2(0,-75) 3(50,-75) 4(50,75) 5(0,75) 6(-50,75)
  silkscreen extent -115,-80 85,80, body extent -79,-90 84,91, height 40
TSOP65P638-16 [mm]
  rect 0.3x1.65 smd: 1(-2.275,-2.775) 2(-1.625,-2.775) 3(-0.975,-2.775) 4(-0.325,-2.775) 5(0.325,-2.775) 6(0.975,-2.775) 7(1.625,-2.775) 8(2.275,-2.775) 9(2.275,2.775) 10(1.625,2.775) 11(0.975,2.775) 12(0.325,2.775) 13(-0.325,2.775) 14(-0.975,2.775) 15(-1.625,2.775) 16(-2.275,2.775)
  silkscreen extent -3.1,-2.9 2.55,1.55, body extent -2.42,-2.59 2.56,2.65, height 0.8
TSOP65P640_HS-28 [mm]
  rect 0.36x1.78 smd: 1(0,0) 2(0.65,0) 3(1.3,0) 4(1.95,0) 5(2.6,0) 6(3.25,0) 7(3.9,0) 8(4.55,0) 9(5.2,0) 10(5.85,0) 11(6.5,0) 12(7.15,0) 13(7.8,0) 14(8.45,0) 15(8.45,5.9) 16(7.8,5.9) 17(7.15,5.9) 18(6.5,5.9) 19(5.85,5.9) 20(5.2,5.9) 21(4.55,5.9) 22(3.9,5.9) 23(3.25,5.9) 24(2.6,5.9) 25(1.95,5.9) 26(1.3,5.9) 27(0.65,5.9) 28(0,5.9)
  Top Layer region: -0.25,4.75 8.65,4.75 8.65,1.15 -0.25,1.15
  silkscreen extent -0.82,-0.12 8.9,4.83, body extent -0.32,0.14 8.64,5.76, height 0.8
TSOP80P1176-44 [mm]
  rect 0.5x1.4 smd: 1(-8.4,-5.7) 2(-7.6,-5.7) 3(-6.8,-5.7) 4(-6,-5.7) 5(-5.2,-5.7) 6(-4.4,-5.7) 7(-3.6,-5.7) 8(-2.8,-5.7) 9(-2,-5.7) 10(-1.2,-5.7) 11(-0.4,-5.7) 12(0.4,-5.7) 13(1.2,-5.7) 14(2,-5.7) 15(2.8,-5.7) 16(3.6,-5.7) 17(4.4,-5.7) 18(5.2,-5.7) 19(6,-5.7) 20(6.8,-5.7) 21(7.6,-5.7) 22(8.4,-5.7) 23(8.4,5.7) 24(7.6,5.7) 25(6.8,5.7) 26(6,5.7) 27(5.2,5.7) 28(4.4,5.7) 29(3.6,5.7) 30(2.8,5.7) 31(2,5.7) 32(1.2,5.7) 33(0.4,5.7) 34(-0.4,5.7) 35(-1.2,5.7) 36(-2,5.7) 37(-2.8,5.7) 38(-3.6,5.7) 39(-4.4,5.7) 40(-5.2,5.7) 41(-6,5.7) 42(-6.8,5.7) 43(-7.6,5.7) 44(-8.4,5.7)
  silkscreen extent -9.29,-5.7 9.26,4.45, body extent -9.24,-5.95 9.26,5.84, height 1
TSOP80P1176-54 [mm] "Plastic Small Outline; 54 Leads; Body Width 10.16 mm"
  rect 0.5x1.4 smd: 1(-10.4,-5.7) 2(-9.6,-5.7) 3(-8.8,-5.7) 4(-8,-5.7) 5(-7.2,-5.7) 6(-6.4,-5.7) 7(-5.6,-5.7) 8(-4.8,-5.7) 9(-4,-5.7) 10(-3.2,-5.7) 11(-2.4,-5.7) 12(-1.6,-5.7) 13(-0.8,-5.7) 14(0,-5.7) 15(0.8,-5.7) 16(1.6,-5.7) 17(2.4,-5.7) 18(3.2,-5.7) 19(4,-5.7) 20(4.8,-5.7) 21(5.6,-5.7) 22(6.4,-5.7) 23(7.2,-5.7) 24(8,-5.7) 25(8.8,-5.7) 26(9.6,-5.7) 27(10.4,-5.7) 28(10.4,5.7) 29(9.6,5.7) 30(8.8,5.7) 31(8,5.7) 32(7.2,5.7) 33(6.4,5.7) 34(5.6,5.7) 35(4.8,5.7) 36(4,5.7) 37(3.2,5.7) 38(2.4,5.7) 39(1.6,5.7) 40(0.8,5.7) 41(0,5.7) 42(-0.8,5.7) 43(-1.6,5.7) 44(-2.4,5.7) 45(-3.2,5.7) 46(-4,5.7) 47(-4.8,5.7) 48(-5.6,5.7) 49(-6.4,5.7) 50(-7.2,5.7) 51(-8,5.7) 52(-8.8,5.7) 53(-9.6,5.7) 54(-10.4,5.7)
  silkscreen extent -11.34,-5.67 11.15,4.4, body extent -11.23,-5.96 11.19,5.97, height 1
TSOP95P275-6 [mm]
  rect 0.7x1 smd: 1(-0.95,-1.2) 2(0,-1.2) 3(0.95,-1.2) 4(0.95,1.2) 5(0,1.2) 6(-0.95,1.2)
  silkscreen extent -1.87,-1.33 1.5,0.7, body extent -1.49,-1.3 1.51,1.3, height 0.8
TSSOP50P490-10 [mm]
  rect 1.5x0.25 smd: 1(-2.5,1) 2(-2.5,0.5) 3(-2.5,0) 4(-2.5,-0.5) 5(-2.5,-1) 6(2.5,-1) 7(2.5,-0.5) 8(2.5,0) 9(2.5,0.5) 10(2.5,1)
  silkscreen extent -1.5,-1.4 1.5,1.4, body extent -2.68,-1.41 2.78,1.43, height 0.9
"XTAL QSC26 QSMC-200S COMBI" [mm] "XTAL MC-306"
  rect 1.9x1.3 smd: 0(-1.615,-6.515) 0(1.615,-6.515) 1(-1.615,-1.015) 2(1.615,-1.015)
  silkscreen extent -1.9,-7.75 1.9,0.25, body extent -2.4,-7.77 2.47,0.25, height 1.7
XTAL-200X126-4 [mil] "CRYSTAL SMD 200x126x44 mils, 4 pads"
  rect 63x55 smd: 1(-81.5,-47.5) 2(81.5,-47.5) 3(81.5,47.5) 4(-81.5,47.5)
  silkscreen extent -31,-72 31,72, body extent -114,-73 113,73, height 39